# Altium PCB NB3000XN.PcbDoc (part 58 of 71)
Units mil, origin at the board's own origin, x right, y up, seen from the top; angles counter-clockwise.
Board outline 9527.56 x 6929.77 mil, 6 copper layers (Top Layer, GND+SHIELD, MidLayer1, MidLayer2, P2 - 3V3+5V0, Bottom Layer), stack 62.375 mil thick; 832 components, 1027 nets, 4655 pads, 4981 vias.
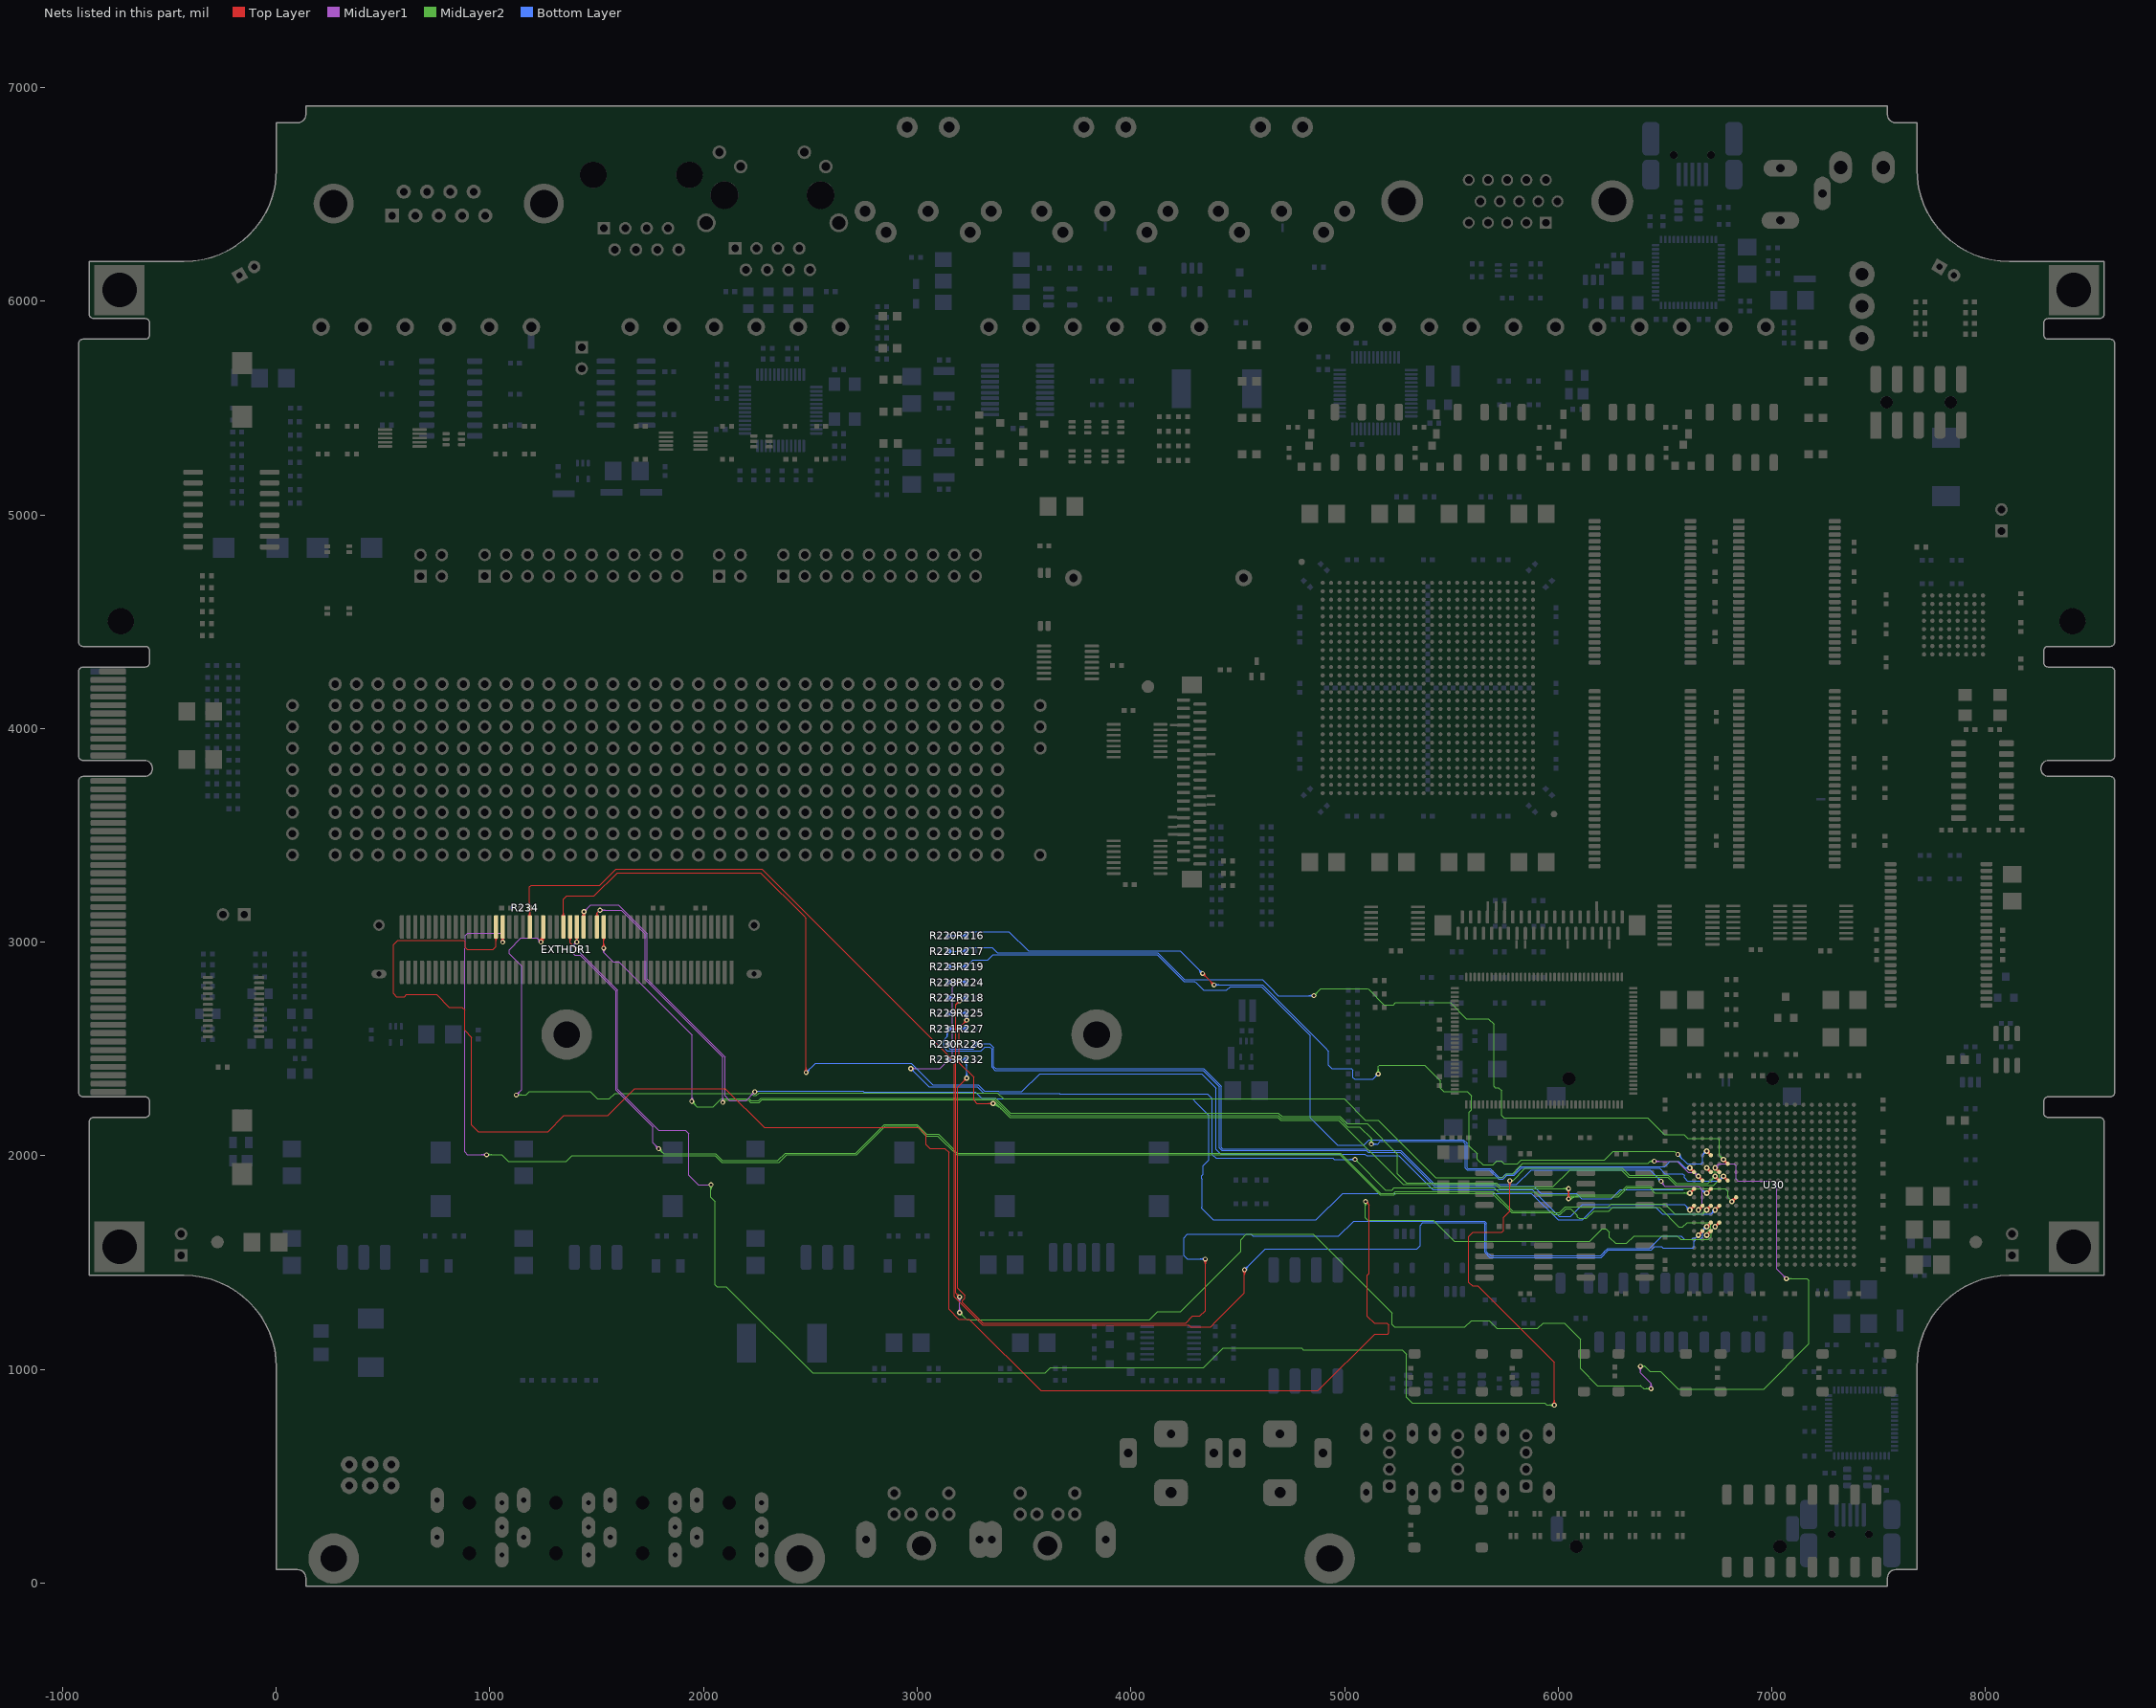
[diagram p62: the nets of this part, all layers, seen from the top]

## Via types
v1: diameter 23, hole 11.81, Top Layer to Bottom Layer, 3672 vias
v2: diameter 26, hole 11.81, Top Layer to Bottom Layer, 461 vias
v3: diameter 19, hole 11.81, Top Layer to Bottom Layer, tented both sides, 396 vias
v4: diameter 23.62, hole 11.81, Top Layer to Bottom Layer, 288 vias
v5: diameter 20, hole 11.81, Top Layer to Bottom Layer, 91 vias
v6: diameter 23, hole 11.81, Top Layer to Bottom Layer, tented both sides, 50 vias
v7: diameter 31, hole 11.81, Top Layer to Bottom Layer, 15 vias
v8: diameter 27.56, hole 11.81, Top Layer to Bottom Layer, tented both sides, 4 vias
v9: diameter 29, hole 11.81, Top Layer to Bottom Layer, 3 vias
v10: diameter 21, hole 11.81, Top Layer to Bottom Layer, 1 vias

## Nets (pads, with @x,y where several pads share a name; then routed paths per layer and width w, separated by ;. In a path a pad name is that pad's centre, name@x,y a point inside that pad or via, vN(x,y) a via of type N, cw(c..) or ccw(c..) an arc to the next point about the centre after c; other vN are vias at no path point) (continued)
PB_SPI.SCLK: EXTHDR1.57 U30.W10 | length 7349.8
  Top Layer w4: v1@1232.79,3007.44 ccw(c1192.61,3047.62) EXTHDR1.57@1249.43,3047.62 ; v1@1235.62,3004.61 ccw(c1202.27,3037.97) EXTHDR1.57@1249.43,3037.97 ; v1@1238.45,3001.79 ccw(c1211.92,3028.31) EXTHDR1.57@1249.43,3028.31 ; v1(1239.51,3000.72) 1240.19,3000.04 1249.43,3009.28 ; v1@1241.27,2998.96 ccw(c1221.58,3018.65) EXTHDR1.57@1249.43,3018.65 ; v1@1244.1,2996.13 ccw(c1231.24,3008.99) 1249.43,3008.99 ; EXTHDR1.57@1244.21,3020.67 cw(c1234.41,3009.28) 1249.43,3009.28 ; EXTHDR1.57@1249.43,3071.85 1249.43,3009.28 ; EXTHDR1.57@1254.65,3020.67 ccw(c1264.46,3009.28) 1249.43,3009.28
  Top Layer w8: v2@6655.67,1895.37 cw(c6655.67,1873.64) 6671.03,1889.01 cw(c6686.4,1904.37) v2@6664.67,1904.37 ; v2(6655.67,1904.37) U30.W10@6675.35,1884.68 ; U30.W10@6669.51,1884.68 ccw(c6655.41,1884.68) 6665.38,1894.66 ccw(c6675.35,1904.63) U30.W10@6675.35,1890.53
  MidLayer1 w4: v1(1123.52,2285.04) 1148.86,2310.37 1148.86,2888 1090,2946.86 1090,2965 1145,3020 1220.23,3020 v1(1239.51,3000.72) ; v1@1123.52,2290.54 ccw(c1123.52,2303.82) 1132.91,2294.43 ccw(c1142.3,2285.04) v1@1129.02,2285.04 ; v1@1123.52,2294.54 ccw(c1123.52,2317.48) 1139.74,2301.26 ccw(c1155.96,2285.04) v1@1133.02,2285.04 ; v1@1230.01,3000.72 ccw(c1207.07,3000.72) 1223.29,3016.94 ccw(c1239.51,3033.16) v1@1239.51,3010.22 ; v1@1234.01,3000.72 ccw(c1220.73,3000.72) 1230.12,3010.11 ccw(c1239.51,3019.5) v1@1239.51,3006.22 ; v1(6449.52,1975.04) 6556.86,1975.04 6608.19,1923.71 6636.33,1923.71 v2(6655.67,1904.37) ; v1@6453.41,1971.15 cw(c6462.8,1961.76) 6462.8,1975.04 cw(c6462.8,1988.32) v1@6453.41,1978.93 ; v1@6456.24,1968.32 cw(c6472.46,1952.11) 6472.46,1975.04 cw(c6472.46,1997.98) v1@6456.24,1981.76 ; v2@6644.67,1904.37 ccw(c6618.11,1904.37) 6636.89,1923.15 ccw(c6655.67,1941.93) v2@6655.67,1915.37 ; v2@6648.67,1904.37 ccw(c6631.77,1904.37) 6643.72,1916.32 ccw(c6655.67,1928.27) v2@6655.67,1911.37
  MidLayer2 w4: v1(1123.52,2285.04) 1170.04,2285.04 1185.37,2300.37 1469.63,2300.37 1503.29,2266.71 1560,2266.71 1585.29,2292 2223.25,2292 2232.75,2282.5 2247.25,2282.5 2259.25,2294.5 3375.5,2294.5 3403.3,2266.71 4998.52,2266.71 5098.52,2166.71 5156.86,2166.71 5425.7,1897.87 5740.64,1897.87 5759.65,1916.87 5786.05,1916.87 5815.71,1946.54 5834.88,1965.71 6420.71,1965.71 6430.04,1975.04 ; v1@1127.41,2281.15 cw(c1136.8,2271.76) 1136.8,2285.04 cw(c1136.8,2298.32) v1@1127.41,2288.93 ; v1@1130.24,2278.32 cw(c1146.46,2262.11) 1146.46,2285.04 cw(c1146.46,2307.98) v1@1130.24,2291.76 ; v1@6442.04,1969.19 ccw(c6430.04,1959.81) 6430.04,1975.04 ; v1@6442.04,1980.89 cw(c6430.04,1990.27) 6430.04,1975.04 ; v1(6449.52,1975.04) 6430.04,1975.04
PBCTRL.1W.ID: EXTHDR1.61 R234.1 U30.V15 | length 8232
  Top Layer w4: R234.1@1179.59,3152.92 cw(c1163.06,3136.38) 1186.44,3136.38 ; R234.1@1179.59,3167.08 ccw(c1163.68,3182.99) 1186.18,3182.99 ccw(c1208.68,3182.99) R234.1@1192.77,3167.08 ; EXTHDR1.61@1180.78,3122.62 ccw(c1167.12,3136.28) 1186.44,3136.28 ccw(c1205.75,3136.28) EXTHDR1.61@1192.1,3122.62 ; R234.1@1182.42,3155.75 cw(c1172.71,3146.04) 1186.44,3146.04 ; R234.1@1182.42,3164.25 ccw(c1173.34,3173.33) 1186.18,3173.33 ccw(c1199.02,3173.33) R234.1@1189.94,3164.25 ; EXTHDR1.61@1186.44,3071.85 1186.44,3159.74 R234.1@1186.18,3160 1186.18,3258.71 1194.18,3266.71 1515.19,3266.71 1590.19,3341.71 2273.52,3341.71 3112.7,2502.53 3173.19,2442.04 3173.19,1340.35 3305.17,1208.37 4271.63,1208.37 4280,1200 4373.48,1200 4400.9,1227.42 4531.86,1358.37 v1(4531.86,1466.71) ; 1186.44,3137.64 cw(c1208.05,3137.64) R234.1@1192.77,3152.92 ; 1186.44,3147.29 cw(c1198.4,3147.29) R234.1@1189.94,3155.75 ; v1@4525.14,1459.99 cw(c4508.92,1443.77) 4531.86,1443.77 cw(c4554.79,1443.77) v1@4538.57,1459.99 ; v1@4527.97,1462.82 cw(c4518.58,1453.43) 4531.86,1453.43 cw(c4545.14,1453.43) v1@4535.75,1462.82
  Top Layer w8: v2(6695.04,1668.15) U30.V15@6714.72,1687.83 ; v2@6695.04,1677.15 ccw(c6695.04,1698.88) 6710.4,1683.51 ccw(c6725.77,1668.15) v2@6704.04,1668.15 ; U30.V15@6708.88,1687.83 cw(c6694.78,1687.83) 6704.75,1677.86 cw(c6714.72,1667.89) U30.V15@6714.72,1681.99
  Bottom Layer w4: v1(4531.86,1466.71) 4630.15,1565 5340,1565 5355,1580 5355,1675 5367,1687 5651.69,1687 5657,1681.69 5657,1548.04 5680,1525.04 6202.19,1525.04 6235.86,1558.71 6436.52,1558.71 6452.86,1575.04 6484.52,1575.04 6490.19,1569.37 6631.52,1569.37 6635.52,1573.37 6635.52,1600.04 6644.19,1608.71 6662.86,1608.71 6675.52,1621.37 6675.52,1648.63 v2(6695.04,1668.15) ; v1@4531.86,1472.21 ccw(c4531.86,1485.49) 4541.25,1476.1 ccw(c4550.64,1466.71) v1@4537.36,1466.71 ; v1@4531.86,1476.21 ccw(c4531.86,1499.14) 4548.07,1482.93 ccw(c4564.29,1466.71) v1@4541.36,1466.71 ; 6683.09,1656.2 ccw(c6671.14,1668.15) v2@6688.04,1668.15 ; 6683.09,1656.2 cw(c6695.04,1644.25) v2@6695.04,1661.15 ; v2@6684.04,1668.15 cw(c6657.48,1668.15) 6676.26,1649.37 cw(c6695.04,1630.6) v2@6695.04,1657.15
PBCTRL.1W.PIO1: EXTHDR1.69 U30.V16 | length 7898.4
  Top Layer w4: v1@1053.74,3007.17 ccw(c1037.52,3023.39) 1060.46,3023.39 ccw(c1083.39,3023.39) v1@1067.17,3007.17 ; v1@1056.57,3004.34 ccw(c1047.18,3013.73) 1060.46,3013.73 ccw(c1073.73,3013.73) v1@1064.34,3004.34 ; v1(1060.46,3000.46) EXTHDR1.69@1060.46,3071.85
  Top Layer w8: v2(6695.04,1628.78) U30.V16@6714.72,1648.46 ; v2@6695.04,1637.78 ccw(c6695.04,1659.51) 6710.4,1644.14 ccw(c6725.77,1628.78) v2@6704.04,1628.78 ; U30.V16@6708.88,1648.46 cw(c6694.78,1648.46) 6704.75,1638.49 cw(c6714.72,1628.52) U30.V16@6714.72,1642.62
  MidLayer1 w4: v1@978.28,1998.28 ccw(c962.06,1982.06) 962.06,2005 ccw(c962.06,2027.93) v1@978.28,2011.72 ; v1@981.11,2001.11 ccw(c971.72,1991.72) 971.72,2005 ccw(c971.72,2018.28) v1@981.11,2008.89 ; v1(985,2005) 895,2005 881.86,2018.14 881.86,2970.71 886.19,2975.04 886.19,3031.19 896.71,3041.71 1053.29,3041.71 1060.46,3034.54 v1(1060.46,3000.46) ; v1@1053.74,3007.17 ccw(c1037.52,3023.39) 1060.46,3023.39 ccw(c1083.39,3023.39) v1@1067.17,3007.17 ; v1@1056.57,3004.34 ccw(c1047.18,3013.73) 1060.46,3013.73 ccw(c1073.73,3013.73) v1@1064.34,3004.34
  MidLayer2 w4: v1(985,2005) 1055,2005 1086.69,1973.31 1358.27,1973.31 1385,2000.04 2055,2000.04 2065.04,1990 2085.04,1970 2354.96,1970 2389.77,2004.81 2716.63,2004.81 2850.82,2139 2995.87,2139 3041.37,2093.5 3095.73,2093.5 3184.42,2004.81 4978.09,2004.81 5166.19,1816.71 5232.47,1816.71 5240.8,1825.04 5690.19,1825.04 5781.86,1733.37 5970.54,1733.37 5978.92,1725 5995,1725 6009.52,1725.04 6037.19,1752.71 6057.86,1752.71 6090.19,1720.37 6090.19,1715.04 6098.52,1706.71 6131.86,1706.71 6166.86,1741.71 6237.82,1741.71 6254.49,1758.37 6473.52,1758.37 6565.19,1666.71 6581.86,1666.71 6603.52,1688.37 6680,1688.37 6681.23,1687.15 6702.91,1687.15 6714.04,1676.02 6714.04,1660.28 6695.04,1641.28 v2(6695.04,1628.78) ; v1@988.89,2001.11 cw(c998.28,1991.72) 998.28,2005 cw(c998.28,2018.28) v1@988.89,2008.89 ; v1@991.72,1998.28 cw(c1007.93,1982.06) 1007.93,2005 cw(c1007.93,2027.93) v1@991.72,2011.72
PBCTRL.1W.PIO2: EXTHDR1.71 U30.U15 | length 10109.7
  Top Layer w4: EXTHDR1.71@1023.3,3021.07 cw(c1009.65,3007.42) 1028.96,3007.42 cw(c1048.27,3007.42) EXTHDR1.71@1034.62,3021.07 ; EXTHDR1.71@1031.86,3075.04 1028.96,3075.04 EXTHDR1.71@1028.96,3071.85 1028.96,2980.48 1015.19,2966.71 894.52,2966.71 886.19,2975.04 886.19,3000.04 877.86,3008.37 568.37,3008.37 548.52,2988.52 548.52,2760 563.52,2745 600,2745 610,2755 750,2755 810,2695 870,2695 881.86,2683.14 881.86,2588.14 915,2555 915,2143.9 944.9,2114 1271.63,2114 1346.63,2189 1552.94,2189 1678.94,2315 2101.06,2315 2284.06,2132 3006.69,2132 3042,2096.69 3042,2053 3060,2035 3130,2035 3148.86,2016.14 3148.86,1281.14 3195,1235 3243.92,1235 3578.54,900.37 4875.37,900.37 5141.71,1166.71 5201.71,1166.71 5206.69,1171.69 5206.69,1208.31 5198.29,1216.71 5139.19,1216.71 5106.86,1249.04 5106.86,1441.71 5115.19,1450.04 5115.19,1770.04 v1(5098.52,1786.71) ; v1@5098.52,1777.21 cw(c5098.52,1754.27) 5114.74,1770.49 cw(c5130.96,1786.71) v1@5108.02,1786.71 ; v1@5098.52,1781.21 cw(c5098.52,1767.93) 5107.91,1777.32 cw(c5117.3,1786.71) v1@5104.02,1786.71
  Top Layer w8: v2(6734.41,1668.15) U30.U15@6754.09,1687.83 ; v2@6734.41,1677.15 ccw(c6734.41,1698.88) 6749.77,1683.51 ccw(c6765.14,1668.15) v2@6743.41,1668.15 ; U30.U15@6748.25,1687.83 cw(c6734.15,1687.83) 6744.12,1677.86 cw(c6754.09,1667.89) U30.U15@6754.09,1681.99
  MidLayer2 w4: v1@5092.62,1779.27 cw(c5082.92,1767.04) 5098.52,1767.04 cw(c5114.13,1767.04) v1@5104.43,1779.27 ; v1(5098.52,1786.71) 5098.52,1709.48 5109.29,1698.71 5414.76,1698.71 5513.43,1600.04 6147.52,1600.04 6205.86,1658.37 6223.52,1658.37 6240.19,1641.71 6240.19,1619.04 6268.52,1590.71 6320.67,1590.71 6355,1625.04 6558.19,1625.04 6573.52,1609.71 6655,1609.71 6655.07,1609.78 6702.91,1609.78 6715.41,1622.28 6715.41,1649.15 v2@6732.97,1666.71 ; v2@6731.86,1666.71 v2@6732.97,1666.71 ; v2@6732.97,1666.71 6734.4,1666.71 v2(6734.41,1668.15) v2@6732.97,1666.71
PBCTRL.CLK.CLK0: EXTHDR1.51 U30.Y13 | length 7160.4
  Top Layer w4: EXTHDR1.51@1338.26,3122.62 ccw(c1324.61,3136.28) 1343.92,3136.28 ccw(c1363.23,3136.28) EXTHDR1.51@1349.58,3122.62 ; EXTHDR1.51@1343.92,3071.85 1343.92,3200.79 1360.17,3217.04 1488.15,3217.04 1596.15,3325.04 2267.56,3325.04 2467.3,3125.3 2480,3112.6 v1(2480,2390) ; v1@2473.28,2396.72 ccw(c2457.06,2412.93) 2480,2412.93 ccw(c2502.93,2412.93) v1@2486.72,2396.72 ; v1@2476.11,2393.89 ccw(c2466.72,2403.28) 2480,2403.28 ccw(c2493.28,2403.28) v1@2483.89,2393.89
  Top Layer w8: v2(6616.3,1746.89) U30.Y13@6635.98,1766.57 ; v2@6616.3,1755.89 ccw(c6616.3,1777.62) 6631.66,1762.25 ccw(c6647.03,1746.89) v2@6625.3,1746.89 ; U30.Y13@6630.14,1766.57 cw(c6616.04,1766.57) 6626.01,1756.6 cw(c6635.98,1746.63) U30.Y13@6635.98,1760.73
  Bottom Layer w4: v1(2480,2390) 2523.37,2433.37 2971.67,2433.37 3073.54,2331.5 3285.34,2331.5 3314.34,2302.5 3378.82,2302.5 3381.28,2300.04 3490.19,2300.04 3573.52,2383.37 4331.86,2383.37 4398.52,2316.71 4398.52,2050 ; v1@2480,2395.5 ccw(c2480,2408.78) 2489.39,2399.39 ccw(c2498.78,2390) v1@2485.5,2390 ; v1@2480,2399.5 ccw(c2480,2422.43) 2496.22,2406.22 ccw(c2512.43,2390) v1@2489.5,2390 ; 4398.52,2035 4398.52,2050 ; v2@6605.3,1746.89 ccw(c6578.74,1746.89) 6597.52,1765.67 ccw(c6616.3,1784.45) v2@6616.3,1757.89 ; v2@6609.3,1746.89 ccw(c6592.4,1746.89) 6604.35,1758.84 ccw(c6616.3,1770.79) v2@6616.3,1753.89 ; v2(6616.3,1746.89) 6590.76,1772.43 6114.24,1772.43 6058.52,1716.71 6004.86,1716.71 5879.86,1841.71 5412.21,1841.71 5253.21,2000.71 5103.94,2000.71 5096.27,2008.37 4420,2008.37 4398.52,2029.85 4398.52,2050
PBCTRL.CLK.CLK1: EXTHDR1.45 U30.U13 | length 7057.2
  Top Layer w4: EXTHDR1.45@1432.75,3122.62 ccw(c1419.09,3136.28) 1438.41,3136.28 ccw(c1457.72,3136.28) EXTHDR1.45@1444.07,3122.62 ; v1@1433.47,3136.32 cw(c1421.55,3124.41) EXTHDR1.45@1438.41,3124.41 ; EXTHDR1.45@1438.41,3071.85 v1@1438.41,3141.26 ; EXTHDR1.45@1438.41,3115.81 cw(c1467.42,3115.81) v1@1446.91,3136.32 ; EXTHDR1.45@1438.41,3125.46 cw(c1457.77,3125.46) v1@1444.08,3139.15
  Top Layer w8: v2(6734.41,1746.89) U30.U13@6754.09,1766.57 ; v2@6734.41,1755.89 ccw(c6734.41,1777.62) 6749.77,1762.25 ccw(c6765.14,1746.89) v2@6743.41,1746.89 ; U30.U13@6748.25,1766.57 cw(c6734.15,1766.57) 6744.12,1756.6 cw(c6754.09,1746.63) U30.U13@6754.09,1760.73
  MidLayer1 w4: v1(1440.19,3143.04) 1472.19,3175.04 1600.9,3175.04 1735,3040.94 1735,2827.86 1771.25,2791.61 2100,2462.86 2100,2280 2120.63,2259.37 2199.37,2259.37 v1(2240,2300) ; v1@1440.19,3148.54 ccw(c1440.19,3161.82) 1449.58,3152.43 ccw(c1458.97,3143.04) v1@1445.69,3143.04 ; v1@1440.19,3152.54 ccw(c1440.19,3175.48) 1456.41,3159.26 ccw(c1472.63,3143.04) v1@1449.69,3143.04 ; v1@2230.5,2300 cw(c2207.56,2300) 2223.78,2283.78 cw(c2240,2267.56) v1@2240,2290.5 ; v1@2234.5,2300 cw(c2221.22,2300) 2230.61,2290.61 cw(c2240,2281.22) v1@2240,2294.5
  Bottom Layer w4: v1(2240,2300) 2243,2303 2745.94,2303 2749.44,2299.5 3272.08,2299.5 3301.08,2270.5 3365.56,2270.5 3369.19,2266.87 4288.31,2266.87 4305.35,2249.84 4365.52,2189.66 4365.52,1980.81 4338,1953.29 4338,1914.27 4331.02,1907.29 4331.02,1892.79 4333,1890.82 4333,1761.69 4331.02,1759.71 4331.02,1754.23 4385.21,1700.04 4650,1700.04 4867.56,1700.04 4992.56,1825.04 5873.9,1825.04 5998.9,1700.04 6115.19,1700.04 6173.36,1758.21 6457.02,1758.21 6487.34,1727.89 6715.41,1727.89 v2(6734.41,1746.89) ; v2@6723.41,1746.89 cw(c6696.85,1746.89) 6715.63,1728.11 cw(c6734.41,1709.33) v2@6734.41,1735.89 ; v2@6727.41,1746.89 cw(c6710.51,1746.89) 6722.46,1734.94 cw(c6734.41,1722.99) v2@6734.41,1739.89
PBCTRL.CLK.CLK2: EXTHDR1.47 U30.V13 | length 6820.2
  Top Layer w4: EXTHDR1.47@1401.26,3021.07 cw(c1387.73,3007.55) v1@1406.86,3007.55 ; EXTHDR1.47@1405.05,3018.95 cw(c1404.49,3016.65) 1406.86,3016.65 ; EXTHDR1.47@1405.14,3018.93 cw(c1404.63,3016.71) 1406.91,3016.71 ; v1(1406.86,3001.04) 1406.86,3016.65 ; v1@1406.86,3007.28 cw(c1426.36,3007.28) EXTHDR1.47@1412.57,3021.07 ; EXTHDR1.47@1406.91,3071.85 1406.91,3016.71 ; 1406.86,3016.65 cw(c1409.19,3016.65) 1408.68,3018.93 ccw(c1409.19,3016.71) 1406.91,3016.71 ; 1406.86,3016.65 1406.91,3016.71
  Top Layer w8: v2(6695.04,1746.89) U30.V13@6714.72,1766.57 ; v2@6695.04,1755.89 ccw(c6695.04,1777.62) 6710.4,1762.25 ccw(c6725.77,1746.89) v2@6704.04,1746.89 ; U30.V13@6708.88,1766.57 cw(c6694.78,1766.57) 6704.75,1756.6 cw(c6714.72,1746.63) U30.V13@6714.72,1760.73
  MidLayer1 w4: v1@1397.36,3001.04 cw(c1374.42,3001.04) 1390.64,2984.82 cw(c1406.86,2968.61) v1@1406.86,2991.54 ; v1@1401.36,3001.04 cw(c1388.08,3001.04) 1397.47,2991.65 cw(c1406.86,2982.26) v1@1406.86,2995.54 ; v1(1406.86,3001.04) 1381.86,2976.04 1381.86,2955 1396.86,2940 1422.25,2940 1590.19,2772.06 1590.19,2308.5 1762.7,2135.99 1762.7,2060.87 v1(1790.19,2033.37) ; v1@1780.69,2033.37 ccw(c1757.76,2033.37) 1773.97,2049.59 ccw(c1790.19,2065.81) v1@1790.19,2042.87 ; v1@1784.69,2033.37 ccw(c1771.41,2033.37) 1780.8,2042.76 ccw(c1790.19,2052.15) v1@1790.19,2038.87
  MidLayer2 w4: v1@1790.19,2023.87 cw(c1790.19,2000.94) 1806.41,2017.16 cw(c1822.63,2033.37) v1@1799.69,2033.37 ; v1@1790.19,2027.87 cw(c1790.19,2014.6) 1799.58,2023.99 cw(c1808.97,2033.37) v1@1795.69,2033.37 ; v1(1790.19,2033.37) 1813.56,2010 2056.35,2010 2088.35,1978 2348,1978 2382.81,2012.81 2713.31,2012.81 2847.5,2147 2999.19,2147 3044.69,2101.5 3099.05,2101.5 3150.51,2050.04 3187.74,2012.81 4981.42,2012.81 5169.52,1824.71 5229.15,1824.71 5238.31,1833.87 5694.03,1833.87 5694.52,1833.37 5786.19,1741.71 5973.52,1741.71 5981.86,1733.37 6005.52,1733.37 6032.86,1760.71 6234.19,1760.71 6248.52,1775.04 6498.52,1775.04 6545.86,1727.71 6675.86,1727.71 v2(6695.04,1746.89) ; v2@6684.04,1746.89 cw(c6657.48,1746.89) 6676.26,1728.11 cw(c6695.04,1709.33) v2@6695.04,1735.89 ; v2@6688.04,1746.89 cw(c6671.14,1746.89) 6683.09,1734.94 cw(c6695.04,1722.99) v2@6695.04,1739.89
PBCTRL.CLK.EN: EXTHDR1.49 U30.U10 | length 9381.3
  Top Layer w4: EXTHDR1.49@1369.76,3021.07 cw(c1356.1,3007.42) 1375.42,3007.42 cw(c1394.73,3007.42) EXTHDR1.49@1381.07,3021.07 ; EXTHDR1.49@1375.42,3071.85 1375.42,2998.15 v1(1406.86,2966.71) ; v1@1397.36,2966.71 ccw(c1374.42,2966.71) 1390.64,2982.93 ccw(c1406.86,2999.14) v1@1406.86,2976.21 ; v1@1401.36,2966.71 ccw(c1388.08,2966.71) 1397.47,2976.1 ccw(c1406.86,2985.49) v1@1406.86,2972.21 ; v1@5766.81,1876.66 cw(c5750.59,1860.44) 5773.52,1860.44 cw(c5796.46,1860.44) v1@5780.24,1876.66 ; v1@5769.64,1879.49 cw(c5760.25,1870.1) 5773.52,1870.1 cw(c5786.8,1870.1) v1@5777.41,1879.49 ; v1(5773.52,1883.37) 5773.52,1741.71 5744.19,1712.37 5744.19,1650.04 5735.86,1641.71 5601.71,1641.71 5581.86,1621.86 5581.86,1408.37 5598.52,1391.71 5623.52,1391.71 5981.86,1033.37 v1(5981.86,833.37) ; v1@5975.14,840.09 ccw(c5958.92,856.31) 5981.86,856.31 ccw(c6004.79,856.31) v1@5988.57,840.09 ; v1@5977.97,837.26 ccw(c5968.58,846.65) 5981.86,846.65 ccw(c5995.14,846.65) v1@5985.75,837.26
  Top Layer w8: v2@6734.41,1895.37 cw(c6734.41,1873.64) 6749.77,1889.01 cw(c6765.14,1904.37) v2@6743.41,1904.37 ; v2(6734.41,1904.37) U30.U10@6754.09,1884.68 ; U30.U10@6748.25,1884.68 ccw(c6734.15,1884.68) 6744.12,1894.66 ccw(c6754.09,1904.63) U30.U10@6754.09,1890.53
  MidLayer1 w4: v1@1406.86,2957.21 cw(c1406.86,2934.27) 1423.07,2950.49 cw(c1439.29,2966.71) v1@1416.36,2966.71 ; v1@1406.86,2961.21 cw(c1406.86,2947.93) 1416.25,2957.32 cw(c1425.64,2966.71) v1@1412.36,2966.71 ; v1(1406.86,2966.71) 1598.19,2775.37 1598.19,2311.81 1790,2120 1915,2120 1930,2105 1930,1910.23 1975.23,1865 v1(2035,1865)
  MidLayer2 w4: v1@2028.28,1858.28 cw(c2012.06,1842.06) 2035,1842.06 cw(c2057.93,1842.06) v1@2041.72,1858.28 ; v1@2031.11,1861.11 cw(c2021.72,1851.72) 2035,1851.72 cw(c2048.28,1851.72) v1@2038.89,1861.11 ; v1(2035,1865) 2035,1805.23 2055,1785.23 2055,1397 2064,1388 2105.82,1388 2125.99,1367.83 2510.45,983.37 3598.52,983.37 3623.19,1008.04 4340,1008.04 4431.96,1100 4550,1100 4798.52,1100.04 4807.19,1091.37 5270.88,1091.37 5290.19,1072.06 5290.19,869.81 5317.13,842.87 5937.13,842.87 5946.63,833.37 v1(5981.86,833.37) ; v1(5773.52,1883.37) 5786.49,1883.37 5844.82,1941.71 6299.23,1941.71 6332.56,1908.37 6515.19,1908.37 6553.52,1870.04 6700.08,1870.04 v2(6734.41,1904.37) ; v1@5975.14,826.66 ccw(c5958.92,810.44) 5958.92,833.37 ccw(c5958.92,856.31) v1@5975.14,840.09 ; v1@5977.97,829.49 ccw(c5968.58,820.1) 5968.58,833.37 ccw(c5968.58,846.65) v1@5977.97,837.26 ; v2@6723.41,1904.37 cw(c6696.85,1904.37) 6715.63,1885.59 cw(c6734.41,1866.81) v2@6734.41,1893.37 ; v2@6727.41,1904.37 cw(c6710.51,1904.37) 6722.46,1892.42 cw(c6734.41,1880.47) v2@6734.41,1897.37
PBCTRL.JTAG.DETECT: R232.1 R233.1 U30.W16 | length 6012.9
  Top Layer w4: v1@3222.36,2363.71 cw(c3199.42,2363.71) 3215.64,2347.49 cw(c3231.86,2331.27) v1@3231.86,2354.21 ; v1@3226.36,2363.71 cw(c3213.08,2363.71) 3222.47,2354.32 cw(c3231.86,2344.93) v1@3231.86,2358.21 ; v1(3231.86,2363.71) 3189.19,2321.04 3189.19,1380.81 3222.5,1347.5 3222.5,1332.75 3212.25,1322.5 3212.25,1312.61 3308.15,1216.71 4256.67,1216.71 4290,1250.04 4323.52,1250.04 4348.52,1275.04 v1(4348.52,1516.71) ; v1@4341.81,1509.99 cw(c4325.59,1493.77) 4348.52,1493.77 cw(c4371.46,1493.77) v1@4355.24,1509.99 ; v1@4344.64,1512.82 cw(c4335.25,1503.43) 4348.52,1503.43 cw(c4361.8,1503.43) v1@4352.41,1512.82
  Top Layer w8: v2(6655.67,1628.78) U30.W16@6675.35,1648.46 ; v2@6655.67,1637.78 ccw(c6655.67,1659.51) 6671.03,1644.14 ccw(c6686.4,1628.78) v2@6664.67,1628.78 ; U30.W16@6669.51,1648.46 cw(c6655.41,1648.46) 6665.38,1638.49 cw(c6675.35,1628.52) U30.W16@6675.35,1642.62
  Bottom Layer w4: R233.1@3146.18,2450 R232.1@3228.82,2450 3228.82,2425.08 3231.86,2422.04 v1(3231.86,2363.71) ; R233.1@3149.94,2446.24 cw(c3159.02,2437.16) 3159.02,2450 cw(c3159.02,2462.84) R233.1@3149.94,2453.76 ; R233.1@3152.77,2443.41 cw(c3168.68,2427.5) 3168.68,2450 cw(c3168.68,2472.5) R233.1@3152.77,2456.59 ; R232.1@3222.23,2442.92 cw(c3206.32,2427.01) 3228.82,2427.01 cw(c3251.32,2427.01) R232.1@3235.41,2442.92 ; R232.1@3222.23,2443.41 ccw(c3206.32,2427.5) 3206.32,2450 ccw(c3206.32,2472.5) R232.1@3222.23,2456.59 ; R232.1@3225.06,2445.75 cw(c3215.98,2436.67) 3228.82,2436.67 cw(c3241.66,2436.67) R232.1@3232.58,2445.75 ; R232.1@3225.06,2446.24 ccw(c3215.98,2437.16) 3215.98,2450 ccw(c3215.98,2462.84) R232.1@3225.06,2453.76 ; v1@3225.14,2370.43 ccw(c3208.92,2386.64) 3231.86,2386.64 ccw(c3254.79,2386.64) v1@3238.57,2370.43 ; v1@3227.97,2367.6 ccw(c3218.58,2376.99) 3231.86,2376.99 ccw(c3245.14,2376.99) v1@3235.75,2367.6 ; v1@4341.81,1509.99 ccw(c4325.59,1493.77) 4325.59,1516.71 ccw(c4325.59,1539.64) v1@4341.81,1523.43 ; v1@4344.64,1512.82 ccw(c4335.25,1503.43) 4335.25,1516.71 ccw(c4335.25,1529.99) v1@4344.64,1520.6 ; v1(4348.52,1516.71) 4265.19,1516.71 4248.52,1533.37 4248.52,1616.71 4265.19,1633.37 4562.21,1633.37 4570.58,1625 ; 4570.58,1624.71 4973,1624.71 5043.29,1695 5655,1695 5665,1685 5665,1551.35 5683.31,1533.04 6198.19,1533.04 6216.07,1550.92 ; 6215.19,1550.04 6231.86,1566.71 6428.19,1566.71 6486.52,1625.04 6574.86,1625.04 6590.19,1609.71 6624.19,1609.71 6631.19,1616.71 6643.6,1616.71 v2(6655.67,1628.78)
PBCTRL.JTAG.HARD.TCK: R219.1 R223.1 U30.Y9 | length 4593.8
  Top Layer w8: v2@6616.3,1934.74 cw(c6616.3,1913.01) 6631.66,1928.38 cw(c6647.03,1943.74) v2@6625.3,1943.74 ; v2(6616.3,1943.74) U30.Y9@6635.98,1924.06 ; U30.Y9@6630.14,1924.06 ccw(c6616.04,1924.06) 6626.01,1934.03 ccw(c6635.98,1944) U30.Y9@6635.98,1929.9
  Bottom Layer w4: R223.1@3146.18,2885 R219.1@3228.82,2885 3260.53,2916.71 3330,2916.71 3355.67,2942.37 4122.86,2942.37 4235.58,2829.66 4248.19,2817.04 4298.19,2817.04 4306.86,2808.37 4340.19,2775.04 4448.52,2775.04 4465.19,2791.71 4612.21,2791.71 4840.19,2563.73 4840.19,2177.02 4967.5,2049.71 5089.71,2049.71 5115,2075 5556.86,2075.04 5573.52,2058.37 5573.52,1945.37 5577.52,1941.37 5681.52,1941.37 5722.86,1900.04 5739.52,1900.04 5756.19,1916.71 5790.5,1916.71 5823.84,1950.04 6498.52,1950.04 6523.52,1975.04 6564,1975.04 6595.3,1943.74 ; R223.1@3149.94,2881.24 cw(c3159.02,2872.16) 3159.02,2885 cw(c3159.02,2897.84) R223.1@3149.94,2888.76 ; R223.1@3152.77,2878.41 cw(c3168.68,2862.5) 3168.68,2885 cw(c3168.68,2907.5) R223.1@3152.77,2891.59 ; R219.1@3222.23,2878.41 ccw(c3206.32,2862.5) 3206.32,2885 ccw(c3206.32,2907.5) R219.1@3222.23,2891.59 ; R219.1@3225.06,2881.24 ccw(c3215.98,2872.16) 3215.98,2885 ccw(c3215.98,2897.84) R219.1@3225.06,2888.76 ; R219.1@3228.82,2890.81 ccw(c3228.82,2904.84) R219.1@3238.74,2894.92 ; R219.1@3228.82,2894.81 ccw(c3228.82,2918.5) 3245.57,2901.75 ; R219.1@3234.14,2885.49 cw(c3245.79,2885.49) R219.1@3237.55,2893.73 ; R219.1@3238.14,2885.49 cw(c3259.45,2885.49) 3244.38,2900.56 ; v2@6607.26,1937.48 ccw(c6595.3,1929.2) 6595.3,1943.74 ; v2@6607.26,1950 cw(c6595.3,1958.28) 6595.3,1943.74 ; v2@6610.54,1939.75 ccw(c6602.94,1934.48) 6602.94,1943.74 ccw(c6602.94,1953) v2@6610.54,1947.73 ; v2(6616.3,1943.74) 6595.3,1943.74
PBCTRL.JTAG.HARD.TDI: R216.1 R220.1 U30.V7 | length 5126.8
  Top Layer w4: v1@4335.52,2844.21 cw(c4335.52,2821.27) 4351.74,2837.49 cw(c4367.96,2853.71) v1@4345.02,2853.71 ; v1@4335.52,2848.21 cw(c4335.52,2834.93) 4344.91,2844.32 cw(c4354.3,2853.71) v1@4341.02,2853.71 ; v1(4335.52,2853.71) v1(4389.19,2800.04) ; v1@4379.69,2800.04 ccw(c4356.76,2800.04) 4372.97,2816.26 ccw(c4389.19,2832.48) v1@4389.19,2809.54 ; v1@4383.69,2800.04 ccw(c4370.41,2800.04) 4379.8,2809.43 ccw(c4389.19,2818.82) v1@4389.19,2805.54
  Top Layer w8: v2@6695.04,2013.48 cw(c6695.04,1991.75) 6710.4,2007.12 cw(c6725.77,2022.48) v2@6704.04,2022.48 ; v2(6695.04,2022.48) U30.V7@6714.72,2002.8 ; U30.V7@6708.88,2002.8 ccw(c6694.78,2002.8) 6704.75,2012.77 ccw(c6714.72,2022.74) U30.V7@6714.72,2008.64
  MidLayer2 w4: v1@5151.14,2390.09 ccw(c5134.92,2406.31) 5157.86,2406.31 ccw(c5180.79,2406.31) v1@5164.57,2390.09 ; v1@5153.97,2387.26 ccw(c5144.58,2396.65) 5157.86,2396.65 ccw(c5171.14,2396.65) v1@5161.75,2387.26 ; v1(5157.86,2383.37) 5157.86,2418.92 5163.98,2425.04 5374.86,2425.04 5448.52,2351.37 5448.52,2316.71 5465.19,2300.04 5575.15,2300.04 5594.19,2281 5594.19,2215 5584.46,2205.27 5584.46,2046.85 5622.02,2009.29 5622.02,1983.31 5647.34,1958 5695.42,1958 5712.96,1975.54 5734.09,1975.54 5747.09,1962.54 5809.09,1962.54 5828.25,1981.71 6216.25,1981.71 6256.73,2022.19 6544.71,2022.19 v1(6560.52,2006.37)
  Bottom Layer w4: R220.1@3146.18,3030 R216.1@3228.82,3030 3228.82,3046.71 ; R220.1@3149.94,3026.24 cw(c3159.02,3017.16) 3159.02,3030 cw(c3159.02,3042.84) R220.1@3149.94,3033.76 ; R220.1@3152.77,3023.41 cw(c3168.68,3007.5) 3168.68,3030 cw(c3168.68,3052.5) R220.1@3152.77,3036.59 ; R216.1@3222.23,3023.41 ccw(c3206.32,3007.5) 3206.32,3030 ccw(c3206.32,3052.5) R216.1@3222.23,3036.59 ; R216.1@3224.13,3038.54 ccw(c3219.37,3046.71) 3228.82,3046.71 ; R216.1@3225.06,3026.24 ccw(c3215.98,3017.16) 3215.98,3030 ccw(c3215.98,3042.84) R216.1@3225.06,3033.76 ; R216.1@3233.51,3038.54 cw(c3238.27,3046.71) 3228.82,3046.71 ; v1@4326.02,2853.71 ccw(c4303.09,2853.71) 4319.31,2869.93 ccw(c4335.52,2886.14) v1@4335.52,2863.21 ; v1@4330.02,2853.71 ccw(c4316.75,2853.71) 4326.14,2863.1 ccw(c4335.52,2872.49) v1@4335.52,2859.21 ; v1(4335.52,2853.71) 4230.86,2958.37 3645,2958.37 3520,2958.37 3430,3048.37 3230.49,3048.37 3228.82,3046.71 ; v1(4389.19,2800.04) 4570,2800.04 4615.23,2800 4909.01,2506.22 4909.01,2505.97 4925.36,2489.62 4925.36,2475.13 4925,2474.77 4925,2425 4941.63,2408.37 5031.86,2408.37 5040.19,2400.04 5040.19,2366.71 5048.52,2358.37 5132.86,2358.37 v1(5157.86,2383.37) ; v1@4393.08,2796.15 cw(c4402.47,2786.76) 4402.47,2800.04 cw(c4402.47,2813.32) v1@4393.08,2803.93 ; v1@4395.91,2793.32 cw(c4412.13,2777.11) 4412.13,2800.04 cw(c4412.13,2822.98) v1@4395.91,2806.76 ; v1@5148.36,2383.37 cw(c5125.42,2383.37) 5141.64,2367.16 cw(c5157.86,2350.94) v1@5157.86,2373.87 ; v1@5152.36,2383.37 cw(c5139.08,2383.37) 5148.47,2373.99 cw(c5157.86,2364.6) v1@5157.86,2377.87 ; v1@6560.52,1996.87 cw(c6560.52,1973.94) 6576.74,1990.16 cw(c6592.96,2006.37) v1@6570.02,2006.37 ; v1@6560.52,2000.87 cw(c6560.52,1987.6) 6569.91,1996.99 cw(c6579.3,2006.37) v1@6566.02,2006.37 ; v1(6560.52,2006.37) 6603.52,1963.37 6671.52,1963.37 6675.52,1967.37 6675.52,2002.96 v2(6695.04,2022.48) ; v2@6684.04,2022.48 cw(c6657.48,2022.48) 6676.26,2003.7 cw(c6695.04,1984.93) v2@6695.04,2011.48 ; v2@6688.04,2022.48 cw(c6671.14,2022.48) 6683.09,2010.53 cw(c6695.04,1998.58) v2@6695.04,2015.48
PBCTRL.JTAG.HARD.TDO: R217.1 R221.1 U30.T8 | length 4767.8
  Top Layer w8: v2@6773.78,1974.11 cw(c6773.78,1952.38) 6789.14,1967.75 cw(c6804.51,1983.11) v2@6782.78,1983.11 ; v2(6773.78,1983.11) U30.T8@6793.46,1963.43 ; U30.T8@6787.62,1963.43 ccw(c6773.52,1963.43) 6783.49,1973.4 ccw(c6793.46,1983.37) U30.T8@6793.46,1969.27
  MidLayer2 w4: v1(4856.86,2750.04) 4890.19,2783.37 5109.17,2783.37 5112.54,2780 5185.17,2707.37 5228.54,2707.37 5237.88,2716.71 5495.19,2716.71 5570.19,2641.71 5673.52,2641.71 5698.86,2616.37 5698.86,2326.14 5705,2320 5720,2320 5735,2305 5735,2190 5746.63,2178.37 6417.82,2178.37 6496.15,2100.04 6588.86,2100.04 6606.86,2082.04 6751.86,2082.04 6753.52,2080.37 6753.52,2003.37 v2(6773.78,1983.11) ; v1@4856.86,2755.54 ccw(c4856.86,2768.82) 4866.25,2759.43 ccw(c4875.64,2750.04) v1@4862.36,2750.04 ; v1@4856.86,2759.54 ccw(c4856.86,2782.48) 4873.07,2766.26 ccw(c4889.29,2750.04) v1@4866.36,2750.04 ; v2@6762.78,1983.11 ccw(c6736.22,1983.11) 6755,2001.89 ccw(c6773.78,2020.67) v2@6773.78,1994.11 ; v2@6766.78,1983.11 ccw(c6749.88,1983.11) 6761.83,1995.06 ccw(c6773.78,2007.01) v2@6773.78,1990.11
  Bottom Layer w4: R221.1@3146.18,2957.5 R217.1@3228.82,2957.5 3228.82,2973.37 ; R221.1@3149.94,2953.74 cw(c3159.02,2944.66) 3159.02,2957.5 cw(c3159.02,2970.34) R221.1@3149.94,2961.26 ; R221.1@3152.77,2950.91 cw(c3168.68,2935) 3168.68,2957.5 cw(c3168.68,2980) R221.1@3152.77,2964.09 ; R217.1@3222.23,2950.91 ccw(c3206.32,2935) 3206.32,2957.5 ccw(c3206.32,2980) R217.1@3222.23,2964.09 ; R217.1@3224.5,2966.25 ccw(c3220.78,2973.37) 3228.82,2973.37 ; R217.1@3225.06,2953.74 ccw(c3215.98,2944.66) 3215.98,2957.5 ccw(c3215.98,2970.34) R217.1@3225.06,2961.26 ; R217.1@3233.13,2966.25 cw(c3236.86,2973.37) 3228.82,2973.37 ; v1@4850.14,2743.32 ccw(c4833.92,2727.11) 4833.92,2750.04 ccw(c4833.92,2772.98) v1@4850.14,2756.76 ; v1@4852.97,2746.15 ccw(c4843.58,2736.76) 4843.58,2750.04 ccw(c4843.58,2763.32) v1@4852.97,2753.93 ; v1(4856.86,2750.04) 4690.19,2750.04 4648.52,2791.71 4615.19,2825.04 4251.51,2825.04 4126.17,2950.37 3375,2950.37 3350,2975.37 3230.82,2975.37 3228.82,2973.37
PBCTRL.JTAG.HARD.TMS: R218.1 R222.1 U30.U9 | length 8634.2
  Top Layer w4: v1@3189.02,1340 ccw(c3166.09,1340) 3182.31,1356.22 ccw(c3198.52,1372.43) v1@3198.52,1349.5 ; v1@3189.02,2725.04 cw(c3166.09,2725.04) 3182.31,2708.82 cw(c3198.52,2692.61) v1@3198.52,2715.54 ; v1@3193.02,1340 ccw(c3179.75,1340) 3189.14,1349.39 ccw(c3198.52,1358.78) v1@3198.52,1345.5 ; v1@3193.02,2725.04 cw(c3179.75,2725.04) 3189.14,2715.65 cw(c3198.52,2706.26) v1@3198.52,2719.54 ; v1(3198.52,1340) 3181.19,1357.33 3181.19,2707.71 v1(3198.52,2725.04)
  Top Layer w8: v2@6734.41,1934.74 cw(c6734.41,1913.01) 6749.77,1928.38 cw(c6765.14,1943.74) v2@6743.41,1943.74 ; v2(6734.41,1943.74) U30.U9@6754.09,1924.06 ; U30.U9@6748.25,1924.06 ccw(c6734.15,1924.06) 6744.12,1934.03 ccw(c6754.09,1944) U30.U9@6754.09,1929.9
  MidLayer1 w4: v1@3191.81,1273.43 ccw(c3175.59,1289.64) 3198.52,1289.64 ccw(c3221.46,1289.64) v1@3205.24,1273.43 ; v1@3191.81,1333.28 cw(c3175.59,1317.06) 3198.52,1317.06 cw(c3221.46,1317.06) v1@3205.24,1333.28 ; v1@3194.64,1270.6 ccw(c3185.25,1279.99) 3198.52,1279.99 ccw(c3211.8,1279.99) v1@3202.41,1270.6 ; v1@3194.64,1336.11 cw(c3185.25,1326.72) 3198.52,1326.72 cw(c3211.8,1326.72) v1@3202.41,1336.11 ; v1(3198.52,1266.71) v1(3198.52,1340) ; v1@6378.28,1008.28 cw(c6362.06,992.06) 6385,992.06 cw(c6407.93,992.06) v1@6391.72,1008.28 ; v1@6381.11,1011.11 cw(c6371.72,1001.72) 6385,1001.72 cw(c6398.28,1001.72) v1@6388.89,1011.11 ; v1(6385,1015) 6385,985 6435,935 v1(6435,910) ; v1@6428.28,916.72 ccw(c6412.06,932.93) 6435,932.93 ccw(c6457.93,932.93) v1@6441.72,916.72 ; v1@6431.11,913.89 ccw(c6421.72,923.28) 6435,923.28 ccw(c6448.28,923.28) v1@6438.89,913.89 ; v2(6734.41,1943.74) 6754.05,1963.37 6823.52,1963.37 6832.19,1954.71 6832.19,1891.71 6840.52,1883.37 7006.86,1883.37 7023.52,1866.71 7023.52,1469.37 v1(7067.86,1425.04) ; v2@6734.41,1950.74 ccw(c6734.41,1967.64) 6746.36,1955.69 ccw(c6758.31,1943.74) v2@6741.41,1943.74 ; v2@6734.41,1954.74 ccw(c6734.41,1981.3) 6753.19,1962.52 ccw(c6771.96,1943.74) v2@6745.41,1943.74 ; v1@7058.36,1425.04 ccw(c7035.42,1425.04) 7051.64,1441.26 ccw(c7067.86,1457.48) v1@7067.86,1434.54 ; v1@7062.36,1425.04 ccw(c7049.08,1425.04) 7058.47,1434.43 ccw(c7067.86,1443.82) v1@7067.86,1430.54
  MidLayer2 w4: v1@3198.52,1257.21 cw(c3198.52,1234.27) 3214.74,1250.49 cw(c3230.96,1266.71) v1@3208.02,1266.71 ; v1@3198.52,1261.21 cw(c3198.52,1247.93) 3207.91,1257.32 cw(c3217.3,1266.71) v1@3204.02,1266.71 ; v1(3198.52,1266.71) 3232.19,1233.04 4086.96,1233.04 4125.65,1271.73 4234.1,1271.73 4514.64,1552.26 4514.64,1607.57 4540.44,1633.37 4853.88,1633.37 5222.69,1264.56 5222.69,1209.46 5232.94,1199.21 5563.95,1199.21 5594.03,1229.29 5677,1229.29 5714.08,1192.21 5904.63,1192.21 5929.63,1217.21 6029.11,1217.21 6105.36,1140.96 6105.36,1003.91 6184.39,924.88 6385.12,924.88 ; 6385,925 6385.12,924.88 ; v1(6385,1015) 6405,1015 ; v1@6389.26,1011.53 cw(c6396.58,1005.56) 6396.58,1015 cw(c6396.58,1024.44) v1@6389.26,1018.47 ; v1@6392.36,1009 cw(c6405,998.7) 6405,1015 ; v1@6392.36,1021 ccw(c6405,1031.3) 6405,1015 ; v1@6428.28,903.28 ccw(c6412.06,887.06) 6412.06,910 ccw(c6412.06,932.93) v1@6428.28,916.72 ; v1@6431.11,906.11 ccw(c6421.72,896.72) 6421.72,910 ccw(c6421.72,923.28) v1@6431.11,913.89 ; v1(6435,910) 6400,910 6385.12,924.88 ; v1(7067.86,1425.04) 7164.96,1425.04 7174.36,1415.64 7174.36,1120.52 6961.88,908.04 6561.96,908.04 6480,990 6430,990 6405,1015 ; v1@7071.75,1421.15 cw(c7081.14,1411.76) 7081.14,1425.04 cw(c7081.14,1438.32) v1@7071.75,1428.93 ; v1@7074.57,1418.32 cw(c7090.79,1402.11) 7090.79,1425.04 cw(c7090.79,1447.98) v1@7074.57,1431.76
  Bottom Layer w4: R222.1@3146.18,2740 3183.86,2740 v1@3198.52,2725.33 ; R222.1@3149.94,2736.24 cw(c3159.02,2727.16) 3159.02,2740 cw(c3159.02,2752.84) R222.1@3149.94,2743.76 ; R222.1@3152.77,2733.41 cw(c3168.68,2717.5) 3168.68,2740 cw(c3168.68,2762.5) R222.1@3152.77,2746.59 ; v1(3198.52,2725.04) 3213.86,2725.04 R218.1@3228.82,2740 ; R218.1@3219.5,2739.35 cw(c3199.4,2739.01) 3213.62,2724.8 cw(c3226.81,2711.6) R218.1@3228.15,2730.21 ; R218.1@3219.8,2730.99 cw(c3227.64,2723.15) R218.1@3228.44,2734.2 ; R218.1@3220.28,2731.47 ccw(c3212.52,2739.23) R218.1@3223.5,2739.42
PBCTRL.JTAG.SOFT.TCK: R227.1 R231.1 U30.V11 | length 4652.3
  Top Layer w8: v2(6695.04,1825.63) U30.V11@6714.72,1845.31 ; v2@6695.04,1834.63 ccw(c6695.04,1856.36) 6710.4,1840.99 ccw(c6725.77,1825.63) v2@6704.04,1825.63 ; U30.V11@6708.88,1845.31 cw(c6694.78,1845.31) 6704.75,1835.34 cw(c6714.72,1825.37) U30.V11@6714.72,1839.47
  Bottom Layer w4: 3140.19,2557.88 cw(c3182.33,2557.88) R231.1@3152.73,2587.88 ; 3140.19,2567.45 cw(c3172.89,2567.45) R231.1@3149.92,2590.72 ; 3140.19,2577.02 cw(c3163.44,2577.02) R231.1@3147.11,2593.57 ; R231.1@3149.94,2591.24 cw(c3159.02,2582.16) 3159.02,2595 cw(c3159.02,2607.84) R231.1@3149.94,2598.76 ; R231.1@3152.77,2588.41 cw(c3168.68,2572.5) 3168.68,2595 cw(c3168.68,2617.5) R231.1@3152.77,2601.59 ; R227.1@3222.23,2588.41 ccw(c3206.32,2572.5) 3206.32,2595 ccw(c3206.32,2617.5) R227.1@3222.23,2601.59 ; R227.1@3225.06,2591.24 ccw(c3215.98,2582.16) 3215.98,2595 ccw(c3215.98,2607.84) R227.1@3225.06,2598.76 ; R227.1@3228.82,2595 R231.1@3146.18,2595 3140.19,2589.01 3140.19,2558.37 3123.52,2541.71 3123.52,2508.37 3140.19,2491.71 3298.52,2491.71 3316.76,2509.94 3340.06,2509.94 3350,2500 3350,2415 3364.96,2400.04 4337.82,2400.04 4348.54,2389.32 4401.4,2336.45 4414.52,2323.34 4414.52,2036.48 4426,2025 4715,2025 5102.23,2025.04 5110.56,2016.71 5260.19,2016.71 5419.19,1857.71 5886.49,1857.71 5919.2,1825 6084.88,1825 6110.17,1799.71 6248.19,1799.71 6273.52,1825.04 6290.19,1841.71 6584.86,1841.71 6590.19,1847.04 6665.19,1847.04 6687.19,1825.04 6698.52,1825.04 6698.52,1825.63 v2(6695.04,1825.63) ; 6669.41,1842.82 ccw(c6686.73,1860.14) v2@6692.47,1836.32 ; 6674.46,1837.77 ccw(c6688.69,1852.01) v2@6693.4,1832.44 ; 6679.51,1832.73 ccw(c6690.65,1843.87) v2@6694.34,1828.55 ; 6682.23,1830 cw(c6677.85,1825.63) v2@6684.04,1825.63
PBCTRL.JTAG.SOFT.TDI: R224.1 R228.1 U30.R12 | length 5600.7
  Top Layer w8: v2(6813.15,1786.26) U30.R12@6832.83,1805.94 ; v2@6813.15,1795.26 ccw(c6813.15,1816.99) 6828.51,1801.62 ccw(c6843.88,1786.26) v2@6822.15,1786.26 ; U30.R12@6826.99,1805.94 cw(c6812.89,1805.94) 6822.86,1795.97 cw(c6832.83,1786) U30.R12@6832.83,1800.1
  MidLayer1 w4: v1(2970,2408.37) 3106.86,2408.37 3165.19,2466.71 3165.19,2788.37 v1(3193.52,2816.71) ; v1@2973.89,2404.49 cw(c2983.28,2395.1) 2983.28,2408.37 cw(c2983.28,2421.65) v1@2973.89,2412.26 ; v1@2976.72,2401.66 cw(c2992.93,2385.44) 2992.93,2408.37 cw(c2992.93,2431.31) v1@2976.72,2415.09 ; v1@3184.02,2816.71 cw(c3161.09,2816.71) 3177.31,2800.49 cw(c3193.52,2784.27) v1@3193.52,2807.21 ; v1@3188.02,2816.71 cw(c3174.75,2816.71) 3184.13,2807.32 cw(c3193.52,2797.93) v1@3193.52,2811.21
  MidLayer2 w4: v1@5049.52,1973.87 cw(c5049.52,1950.94) 5065.74,1967.16 cw(c5081.96,1983.37) v1@5059.02,1983.37 ; v1@5049.52,1977.87 cw(c5049.52,1964.6) 5058.91,1973.99 cw(c5068.3,1983.37) v1@5055.02,1983.37 ; v1(5049.52,1983.37) 5192.19,1840.71 5222.52,1840.71 5231.69,1849.87 5700.66,1849.87 5719.82,1830.71 5892.19,1830.71 5906.19,1816.71 6277.86,1816.71 6319.52,1858.37 6431.86,1858.37 6444.19,1846.04 6781.19,1846.04 6793.86,1833.37 6793.86,1805.55 6798.52,1800.89 v2(6813.15,1786.26)
  Bottom Layer w4: v1@2970,2398.87 cw(c2970,2375.94) 2986.22,2392.16 cw(c3002.43,2408.37) v1@2979.5,2408.37 ; v1@2970,2402.87 cw(c2970,2389.6) 2979.39,2398.99 cw(c2988.78,2408.37) v1@2975.5,2408.37 ; v1(2970,2408.37) 3054.87,2323.5 3282.02,2323.5 3311.02,2294.5 3375.5,2294.5 3379,2291 3666.15,2291 3666.28,2290.87 4357.69,2290.87 4381.52,2267.04 4381.52,2005 4397.71,1988.81 4946.07,1988.81 4951.5,1983.37 v1(5049.52,1983.37) ; R228.1@3146.18,2812.5 3189.52,2812.5 3193.52,2816.5 v1(3193.52,2816.71) 3224.61,2816.71 R224.1@3228.82,2812.5 ; R228.1@3149.94,2808.74 cw(c3159.02,2799.66) 3159.02,2812.5 cw(c3159.02,2825.34) R228.1@3149.94,2816.26 ; R228.1@3152.77,2805.91 cw(c3168.68,2790) 3168.68,2812.5 cw(c3168.68,2835) R228.1@3152.77,2819.09 ; 3160.43,2812.5 ccw(c3160.43,2849.8) v1@3186.81,2823.43 ; 3170.09,2812.5 ccw(c3170.09,2840.14) v1@3189.64,2820.6 ; 3179.74,2812.5 ccw(c3179.74,2830.49) v1@3192.46,2817.77 ; 3180.75,2812.5 cw(c3180.75,2803.93) v1@3186.81,2809.99 ; v1@3197.35,2816.71 cw(c3197.35,2781.52) R224.1@3222.23,2806.4 ; v1@3197.41,2812.82 cw(c3206.8,2803.43) 3206.8,2816.71 cw(c3206.8,2829.99) v1@3197.41,2820.6 ; v1@3200.24,2809.99 cw(c3216.46,2793.77) 3216.46,2816.71 cw(c3216.46,2839.64) v1@3200.24,2823.43 ; 3207.01,2816.71 cw(c3207.01,2791.18) R224.1@3225.06,2809.23 ; 3215.29,2816.71 ccw(c3215.29,2826.52) R224.1@3222.23,2819.58 ; 3216.66,2816.71 cw(c3216.66,2800.84) R224.1@3227.89,2812.06 ; v1@5042.81,1976.66 ccw(c5026.59,1960.44) 5026.59,1983.37 ccw(c5026.59,2006.31) v1@5042.81,1990.09 ; v1@5045.64,1979.49 ccw(c5036.25,1970.1) 5036.25,1983.37 ccw(c5036.25,1996.65) v1@5045.64,1987.26
PBCTRL.JTAG.SOFT.TDO: R225.1 R229.1 U30.Y11 | length 5054.2
  Top Layer w4: v1@3222.36,2635.04 cw(c3199.42,2635.04) 3215.64,2618.82 cw(c3231.86,2602.61) v1@3231.86,2625.54 ; v1@3226.36,2635.04 cw(c3213.08,2635.04) 3222.47,2625.65 cw(c3231.86,2616.26) v1@3231.86,2629.54 ; v1(3231.86,2635.04) 3197.19,2600.37 3197.19,2435.98 3264.86,2368.31 3264.86,2260.14 3280,2245 v1(3355,2245) ; v1@3348.28,2238.28 ccw(c3332.06,2222.06) 3332.06,2245 ccw(c3332.06,2267.93) v1@3348.28,2251.72 ; v1@3351.11,2241.11 ccw(c3341.72,2231.72) 3341.72,2245 ccw(c3341.72,2258.28) v1@3351.11,2248.89 ; v1@6041.81,1805.76 ccw(c6025.59,1821.98) 6048.52,1821.98 ccw(c6071.46,1821.98) v1@6055.24,1805.76 ; v1@6041.81,1839.99 cw(c6025.59,1823.77) 6048.52,1823.77 cw(c6071.46,1823.77) v1@6055.24,1839.99 ; v1@6044.64,1802.93 ccw(c6035.25,1812.32) 6048.52,1812.32 ccw(c6061.8,1812.32) v1@6052.41,1802.93 ; v1@6044.64,1842.82 cw(c6035.25,1833.43) 6048.52,1833.43 cw(c6061.8,1833.43) v1@6052.41,1842.82 ; v1(6048.52,1799.04) v1(6048.52,1846.71)
  Top Layer w8: v2(6616.3,1825.63) U30.Y11@6635.98,1845.31 ; v2@6616.3,1834.63 ccw(c6616.3,1856.36) 6631.66,1840.99 ccw(c6647.03,1825.63) v2@6625.3,1825.63 ; U30.Y11@6630.14,1845.31 cw(c6616.04,1845.31) 6626.01,1835.34 cw(c6635.98,1825.37) U30.Y11@6635.98,1839.47
  MidLayer2 w4: v1@3355,2235.5 cw(c3355,2180.13) 3394.15,2219.28 ; v1@3355,2239.5 cw(c3355,2193.79) 3387.32,2226.11 ; v1@3355,2243.5 cw(c3355,2207.44) 3380.5,2232.94 ; v1(3355,2245) 3368.43,2245 3433.43,2180 4687.77,2180 4700.77,2167 4972.62,2167 5273.75,1865.87 5707.28,1865.87 5726.45,1846.71 v1(6048.52,1846.71) ; v1@3355,2247.5 cw(c3355,2221.1) 3373.67,2239.77 ; v1@3355,2251.5 cw(c3355,2234.76) 3366.84,2246.6 ; v1@6041.81,1839.99 ccw(c6025.59,1823.77) 6025.59,1846.71 ccw(c6025.59,1869.64) v1@6041.81,1853.43 ; v1@6044.64,1842.82 ccw(c6035.25,1833.43) 6035.25,1846.71 ccw(c6035.25,1859.99) v1@6044.64,1850.6 ; v1@6046.76,1800.81 cw(c6065.02,1782.54) 6065.02,1808.37 ; v1(6048.52,1799.04) 6057.86,1808.37 6281.86,1808.37 6323.52,1850.04 6428.88,1850.04 6453.29,1825.63 v2(6616.3,1825.63) ; v1@6049.58,1797.98 cw(c6074.68,1772.89) 6074.68,1808.37 ; v1@6052.41,1795.15 cw(c6084.34,1763.23) 6084.34,1808.37 ; v1@6055.24,1792.32 cw(c6093.99,1753.57) 6093.99,1808.37 ; v2@6608.52,1817.85 ccw(c6589.74,1799.07) 6589.74,1825.63 ccw(c6589.74,1852.19) v2@6608.52,1833.41 ; v2@6611.35,1820.68 ccw(c6599.4,1808.73) 6599.4,1825.63 ccw(c6599.4,1842.53) v2@6611.35,1830.58
  Bottom Layer w4: R229.1@3146.18,2667.5 R225.1@3228.82,2667.5 3228.82,2646.41 ; R229.1@3149.94,2663.74 cw(c3159.02,2654.66) 3159.02,2667.5 cw(c3159.02,2680.34) R229.1@3149.94,2671.26 ; R229.1@3152.77,2660.91 cw(c3168.68,2645) 3168.68,2667.5 cw(c3168.68,2690) R229.1@3152.77,2674.09 ; R225.1@3222.23,2660.91 ccw(c3206.32,2645) 3206.32,2667.5 ccw(c3206.32,2690) R225.1@3222.23,2674.09 ; R225.1@3222.67,2660.01 cw(c3210.72,2646.41) 3228.82,2646.41 ; R225.1@3225.06,2663.74 ccw(c3215.98,2654.66) 3215.98,2667.5 ccw(c3215.98,2680.34) R225.1@3225.06,2671.26 ; v1@3225.14,2641.76 ccw(c3216.26,2650.64) 3228.82,2650.64 ; R225.1@3225.31,2663.01 cw(c3218.49,2655.25) 3228.82,2655.25 cw(c3239.15,2655.25) R225.1@3232.33,2663.01 ; 3228.82,2655.65 ccw(c3252.47,2655.65) v1@3235.75,2638.93 ; R225.1@3228.82,2665.31 ccw(c3262.13,2665.31) v1@3238.57,2641.76 ; v1(3231.86,2635.04) 3231.86,2643.37 3228.82,2646.41 ; R225.1@3234.97,2660.01 ccw(c3246.92,2646.41) 3228.82,2646.41
PBCTRL.JTAG.SOFT.TMS: R226.1 R230.1 U30.W13 | length 4544.3
  Top Layer w8: v2(6655.67,1746.89) U30.W13@6675.35,1766.57 ; v2@6655.67,1755.89 ccw(c6655.67,1777.62) 6671.03,1762.25 ccw(c6686.4,1746.89) v2@6664.67,1746.89 ; U30.W13@6669.51,1766.57 cw(c6655.41,1766.57) 6665.38,1756.6 cw(c6675.35,1746.63) U30.W13@6675.35,1760.73
  MidLayer1 w4: v1@6481.86,1871.87 cw(c6481.86,1864.23) 6487.26,1869.64 ; v1(6481.86,1881.37) 6481.86,1875.04 6498.52,1858.37 6658.19,1858.37 6674.86,1841.71 6674.86,1769.04 ; v1@6487.13,1879.83 ccw(c6500.26,1875.98) 6490.59,1866.31 ; v1@6490.97,1878.7 ccw(c6507.63,1873.82) 6495.36,1861.54 ; v2(6655.67,1746.89) 6655.67,1750.04 6655.86,1750.04 6674.86,1769.04 ; v2@6655.67,1757.89 ccw(c6655.67,1777.29) 6669.39,1763.57 ; v2@6662.66,1747.29 cw(c6682.83,1748.44) 6668.54,1762.73 ; v2@6666.65,1747.52 cw(c6694.77,1749.12) 6674.86,1769.04
  Bottom Layer w4: R230.1@3142.6,2513.4 cw(c3140.37,2508.04) 3146.18,2508.04 ; R230.1@3146.18,2522.5 3146.18,2508.04 ; R230.1@3149.76,2513.4 ccw(c3151.99,2508.04) 3146.18,2508.04 ; R226.1@3267.8,2513.32 cw(c3265.87,2508.38) 3271.18,2508.38 ; R226.1@3274.56,2513.32 ccw(c3276.49,2508.38) 3271.18,2508.38 ; R226.1@3274.94,2519.23 cw(c3288.97,2505.21) 3288.97,2525.04 ; R226.1@3277.77,2516.4 cw(c3298.62,2495.55) 3298.62,2525.04 ; R226.1@3277.77,2529.58 ccw(c3288.73,2540.54) 3288.73,2525.04 ; v1@6472.36,1881.37 ccw(c6449.42,1881.37) 6465.64,1897.59 ccw(c6481.86,1913.81) v1@6481.86,1890.87 ; v1@6476.36,1881.37 ccw(c6463.08,1881.37) 6472.47,1890.76 ccw(c6481.86,1900.15) v1@6481.86,1886.87 ; v1(6481.86,1881.37) 6429.86,1933.37 5873.52,1933.37 5805.86,1865.71 5422.5,1865.71 5263.17,2025.04 5113.54,2025.04 5105.21,2033.37 4428.94,2033.37 4422.52,2039.79 4422.52,2326.65 4341.13,2408.04 3626.96,2408.04 3368.27,2408.04 3358,2418.31 3358,2507.04 3340,2525.04 3273.72,2525.04 R226.1@3271.18,2522.5 3271.18,2508.37 ; 3146.18,2508.04 3154.18,2500.04 3262.85,2500.04 3271.18,2508.37
PBCTRL.SPARE1: EXTHDR1.39 U30.V9 | length 6645.7
  Top Layer w4: v1@1526.18,2978.82 ccw(c1509.96,2995.04) 1532.9,2995.04 ccw(c1555.83,2995.04) v1@1539.61,2978.82 ; EXTHDR1.39@1527.24,3021.07 cw(c1513.58,3007.42) 1532.9,3007.42 cw(c1552.21,3007.42) EXTHDR1.39@1538.55,3021.07 ; v1@1529.01,2975.99 ccw(c1519.62,2985.38) 1532.9,2985.38 ccw(c1546.18,2985.38) v1@1536.79,2975.99 ; v1(1532.9,2972.1) EXTHDR1.39@1532.9,3071.85
  Top Layer w8: v2@6695.04,1934.74 cw(c6695.04,1913.01) 6710.4,1928.38 cw(c6725.77,1943.74) v2@6704.04,1943.74 ; v2(6695.04,1943.74) U30.V9@6714.72,1924.06 ; U30.V9@6708.88,1924.06 ccw(c6694.78,1924.06) 6704.75,1934.03 ccw(c6714.72,1944) U30.V9@6714.72,1929.9
  MidLayer1 w4: v1@1526.9,2964.74 cw(c1516.6,2952.1) 1532.9,2952.1 ; v1@1529.42,2967.84 cw(c1523.46,2960.52) 1532.9,2960.52 cw(c1542.33,2960.52) v1@1536.37,2967.84 ; v1(1532.9,2972.1) 1532.9,2952.1 ; v1@1538.9,2964.74 ccw(c1549.2,2952.1) 1532.9,2952.1 ; v1@1938.28,2261.72 ccw(c1915.97,2284.03) 1947.52,2284.03 ; v1@1941.11,2258.89 ccw(c1925.63,2274.37) 1947.52,2274.37 ; v1(1945,2255) 1945.37,2255 1947.52,2257.15 1947.52,2564.73 1603.54,2908.71 1576.29,2908.71 1532.9,2952.1 ; 1947.52,2271.84 ccw(c1961.84,2271.84) v1@1951.72,2261.72
  MidLayer2 w4: v1@1945,2245.5 cw(c1945,2222.56) 1961.22,2238.78 cw(c1977.43,2255) v1@1954.5,2255 ; v1@1945,2249.5 cw(c1945,2236.22) 1954.39,2245.61 cw(c1963.78,2255) v1@1950.5,2255 ; v1(1945,2255) 1970,2230 2045.44,2230 2083.44,2268 2213.31,2268 2222.81,2258.5 2257.19,2258.5 2269.19,2270.5 3365.56,2270.5 3380.5,2255.56 3436.06,2200 4690.39,2200 4706.69,2183.71 4978.54,2183.71 5012.21,2150.04 5106.86,2150.04 5248.52,2008.37 5248.52,1916.04 5290.7,1873.87 5710.6,1873.87 5729.76,1854.71 5976.33,1854.71 6055.33,1933.71 6295.92,1933.71 6329.58,1900.04 6512.21,1900.04 6550.21,1862.04 6727.19,1862.04 6753.52,1888.37 6753.52,1922.37 6751.86,1924.04 6714.74,1924.04 v2(6695.04,1943.74) ; v2@6695.04,1932.74 cw(c6695.04,1906.18) 6713.82,1924.96 cw(c6732.6,1943.74) v2@6706.04,1943.74 ; v2@6695.04,1936.74 cw(c6695.04,1919.84) 6706.99,1931.79 cw(c6718.94,1943.74) v2@6702.04,1943.74
PBCTRL.SPARE2: EXTHDR1.41 U30.T10 | length 6692.7
  Top Layer w4: EXTHDR1.41@1495.75,3122.63 ccw(c1482.16,3136.25) 1501.4,3136.25 ; EXTHDR1.41@1501.4,3071.85 1501.4,3136.25 ; EXTHDR1.41@1507.05,3122.63 cw(c1520.64,3136.25) 1501.4,3136.25 ; v1(1515.19,3150.04) 1501.4,3136.25
  Top Layer w8: v2@6773.78,1895.37 cw(c6773.78,1873.64) 6789.14,1889.01 cw(c6804.51,1904.37) v2@6782.78,1904.37 ; v2(6773.78,1904.37) U30.T10@6793.46,1884.68 ; U30.T10@6787.62,1884.68 ccw(c6773.52,1884.68) 6783.49,1894.66 ccw(c6793.46,1904.63) U30.T10@6793.46,1890.53
  MidLayer1 w4: v1(1515.19,3150.04) 1614.58,3150.04 1727,3037.62 1727,2824.55 2090.19,2461.36 v1(2090.19,2250) ; v1@1519.08,3146.15 cw(c1528.47,3136.76) 1528.47,3150.04 cw(c1528.47,3163.32) v1@1519.08,3153.93 ; v1@1521.91,3143.32 cw(c1538.13,3127.11) 1538.13,3150.04 cw(c1538.13,3172.98) v1@1521.91,3156.76 ; v1@2083.47,2256.72 ccw(c2067.26,2272.93) 2090.19,2272.93 ccw(c2113.13,2272.93) v1@2096.91,2256.72 ; v1@2086.3,2253.89 ccw(c2076.91,2263.28) 2090.19,2263.28 ccw(c2103.47,2263.28) v1@2094.08,2253.89
  MidLayer2 w4: v1(2090.19,2250) 2100.19,2260 2210,2260 2219.5,2250.5 2260.5,2250.5 2272.5,2262.5 3362.25,2262.5 3372.5,2252.25 3434.75,2190 4689.08,2190 4704.08,2175 4975.94,2175 5014.94,2136 5070.9,2136 5125.52,2081.37 v1(5125.52,2055.37) ; v1@5118.81,2062.09 ccw(c5102.59,2078.31) 5125.52,2078.31 ccw(c5148.46,2078.31) v1@5132.24,2062.09 ; v1@5121.64,2059.26 ccw(c5112.25,2068.65) 5125.52,2068.65 ccw(c5138.8,2068.65) v1@5129.41,2059.26
  Bottom Layer w4: v1(5125.52,2055.37) 5155.37,2055.37 ; v1@5129.41,2051.49 cw(c5138.8,2042.1) 5138.8,2055.37 cw(c5138.8,2068.65) v1@5129.41,2059.26 ; v1@5132.24,2048.66 cw(c5148.46,2032.44) 5148.46,2055.37 cw(c5148.46,2078.31) v1@5132.24,2062.09 ; 5155,2055 5155.37,2055.37 ; v2@6762.78,1904.37 cw(c6736.22,1904.37) 6755,1885.59 cw(c6773.78,1866.82) v2@6773.78,1893.37 ; v2@6766.78,1904.37 cw(c6749.88,1904.37) 6761.83,1892.42 cw(c6773.78,1880.47) v2@6773.78,1897.37 ; v2(6773.78,1904.37) 6752.79,1883.37 6605.52,1883.37 6590.19,1898.71 6590.19,1909.71 6583.19,1916.71 6499.52,1916.71 6474.52,1941.71 5826.82,1941.71 5793.82,1908.71 5759.5,1908.71 5742.38,1891.59 5720,1891.59 5718.91,1892.68 5678.21,1933.37 5573.86,1933.37 5565.19,1942.04 5565.19,2055.39 5553.54,2067.04 5167.04,2067.04 5155.37,2055.37